# Altium PCB final_PCB.PcbDoc
Units mil, origin at the board's own origin, x right, y up, seen from the top; angles counter-clockwise.
Board outline 5118.11 x 3740.16 mil, 4 copper layers (Top Layer, GND, PWR, Bottom Layer), stack 62.205 mil thick; 45 components, 19 nets, 137 pads, 336 vias.
Unrouted connection lines stored in the file: 5.
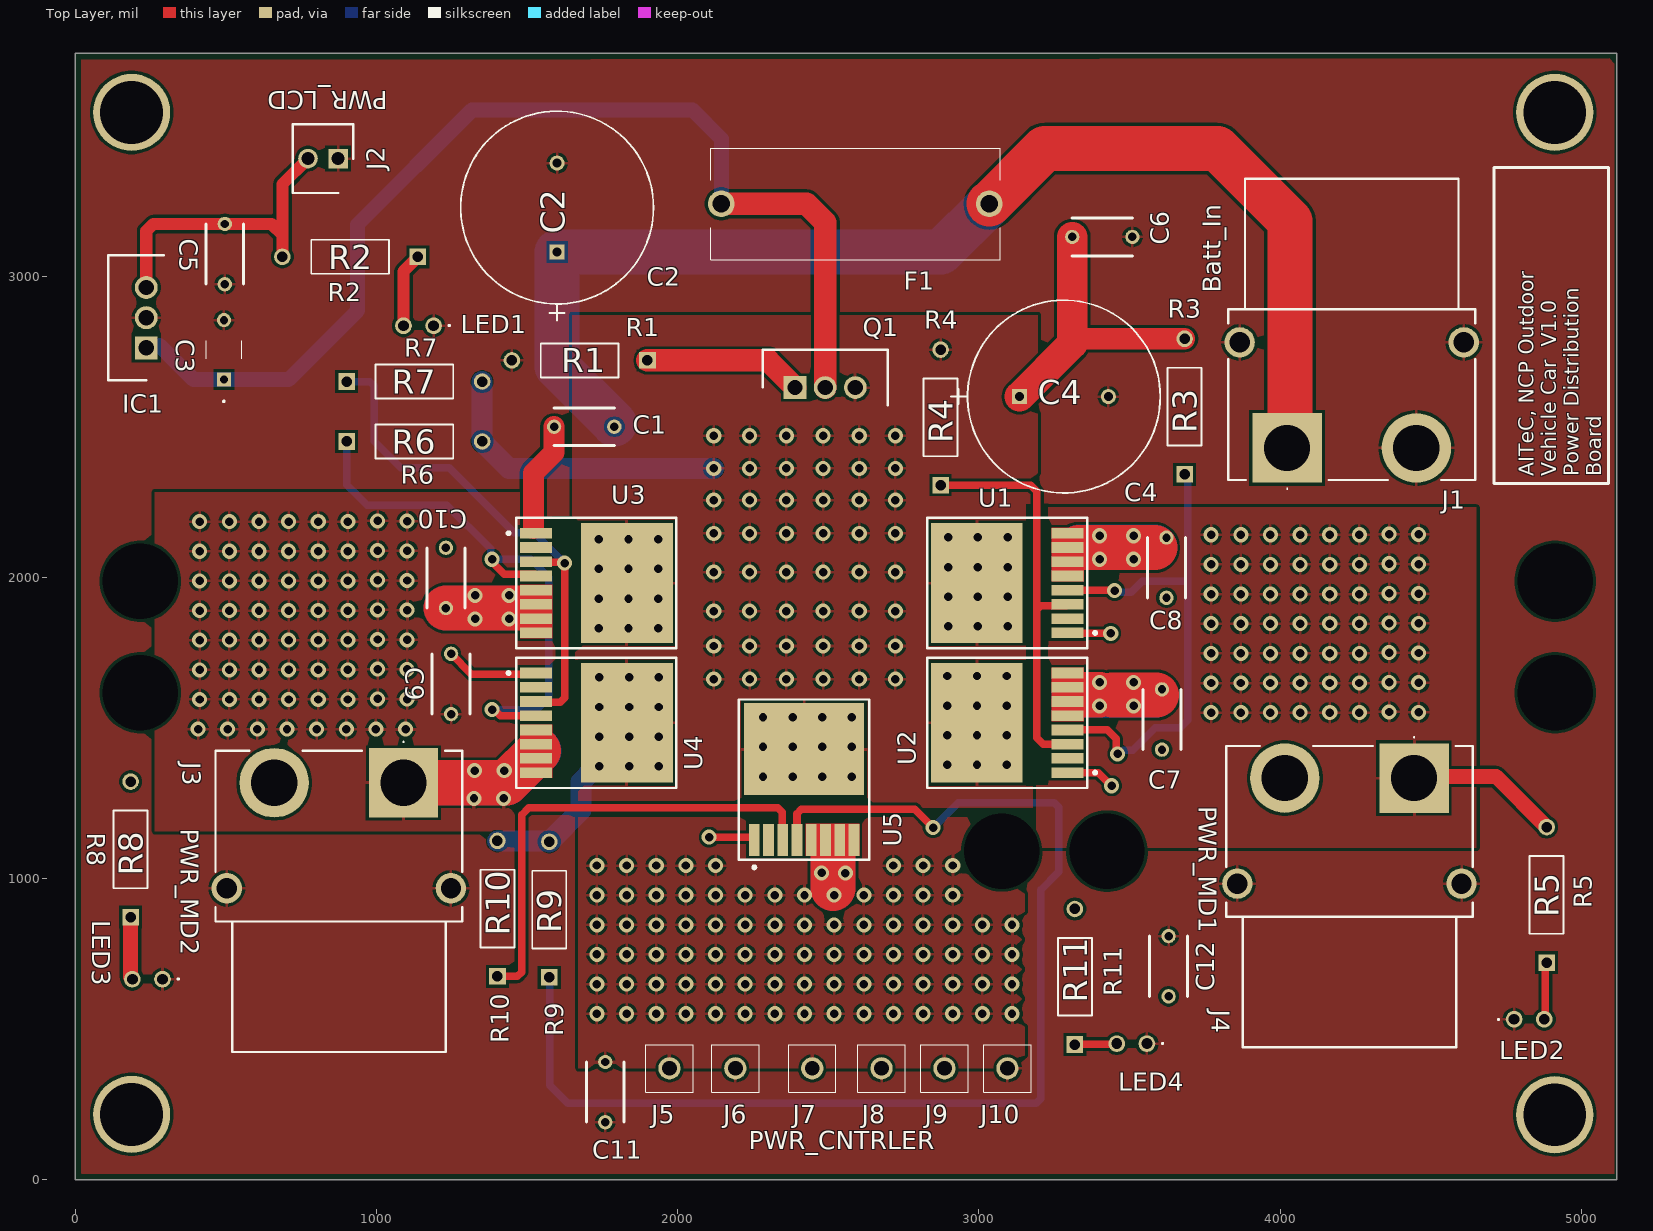
[diagram p0: Top Layer view]
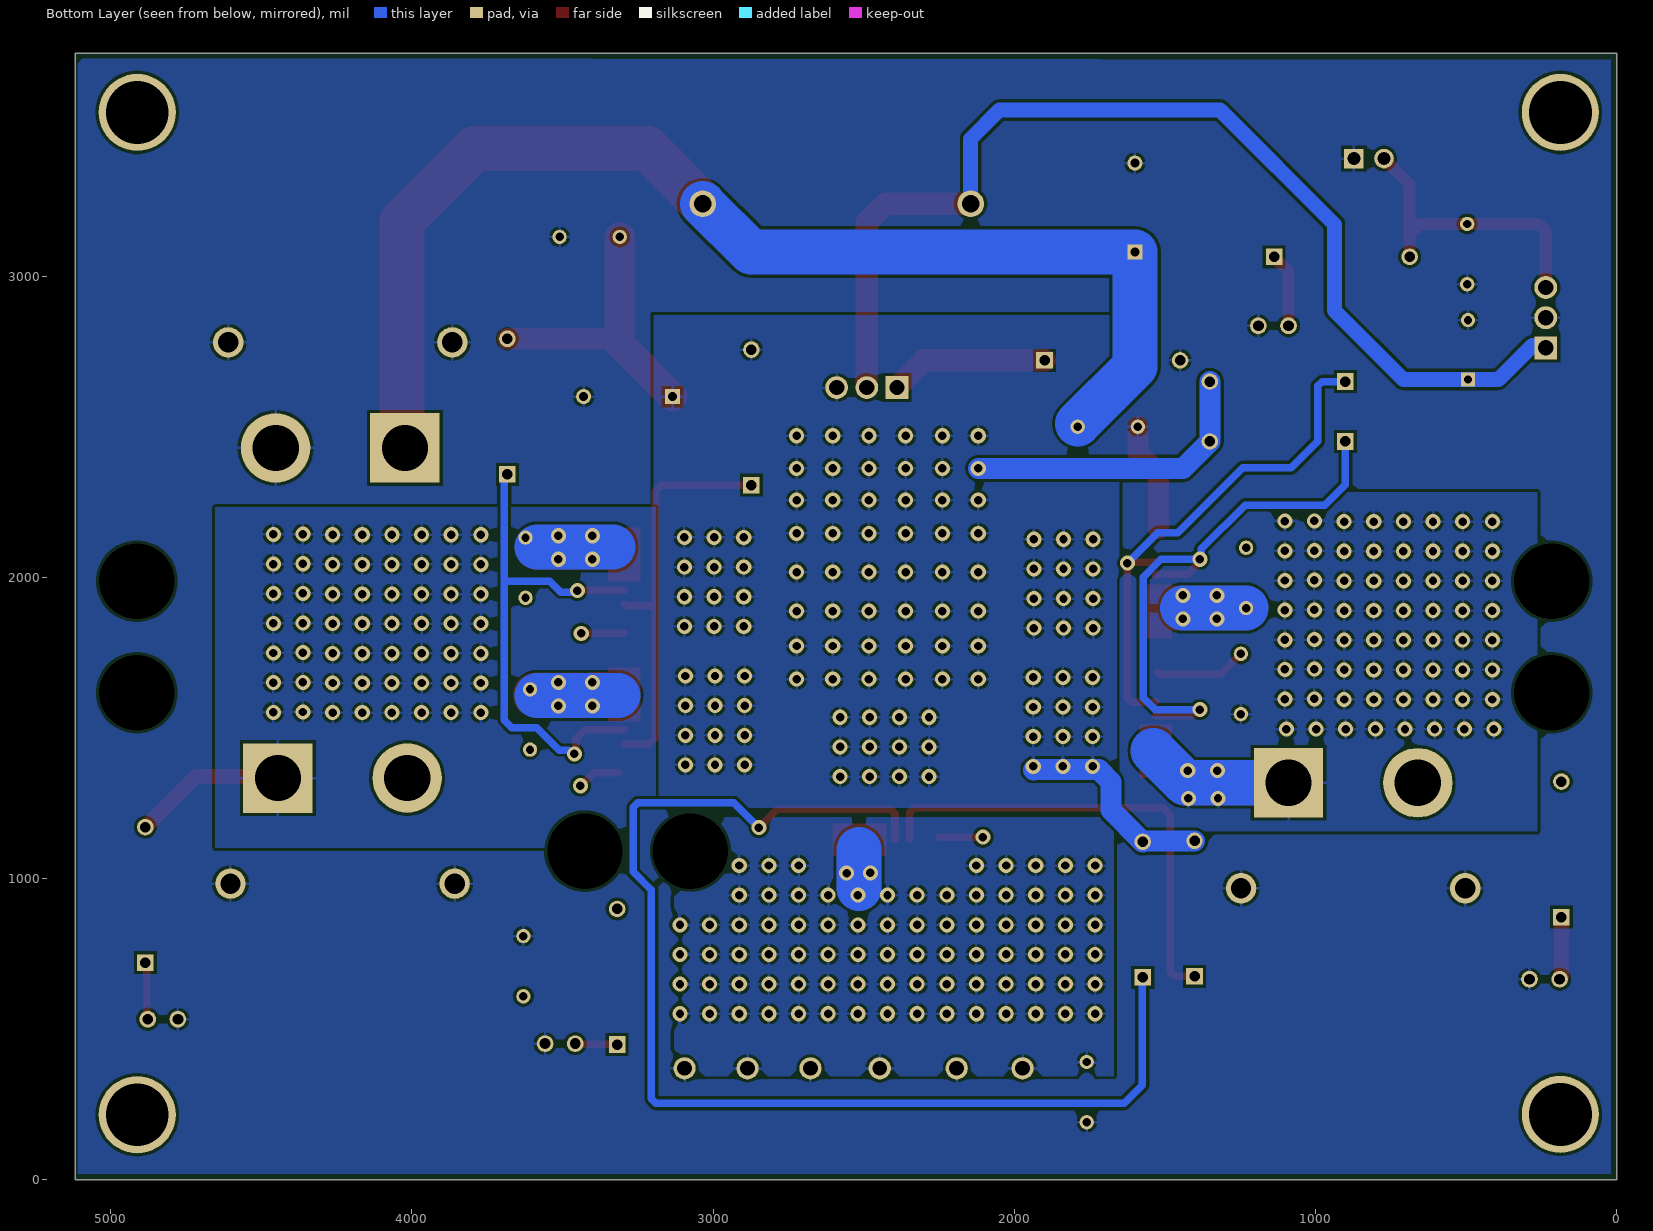
[diagram p1: Bottom Layer view, seen from below]
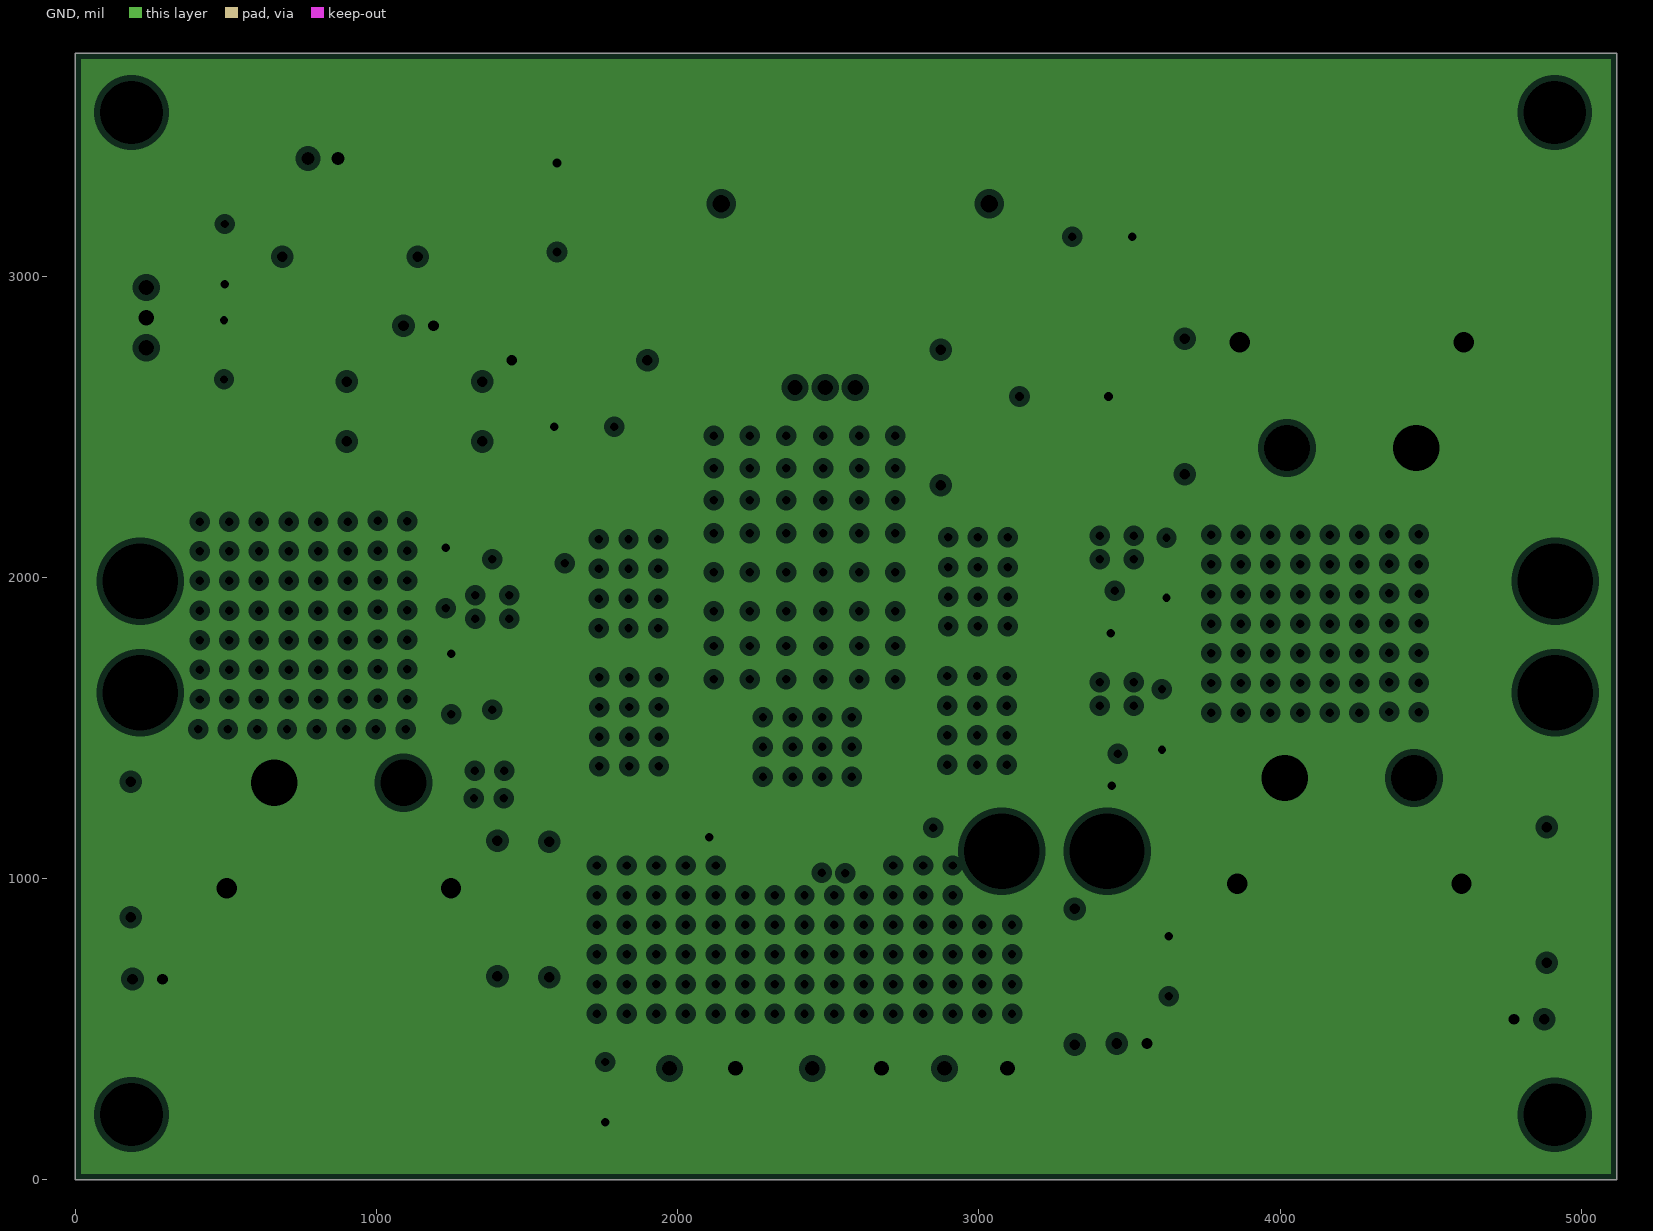
[diagram p2: GND, clearances drawn from the general rule]
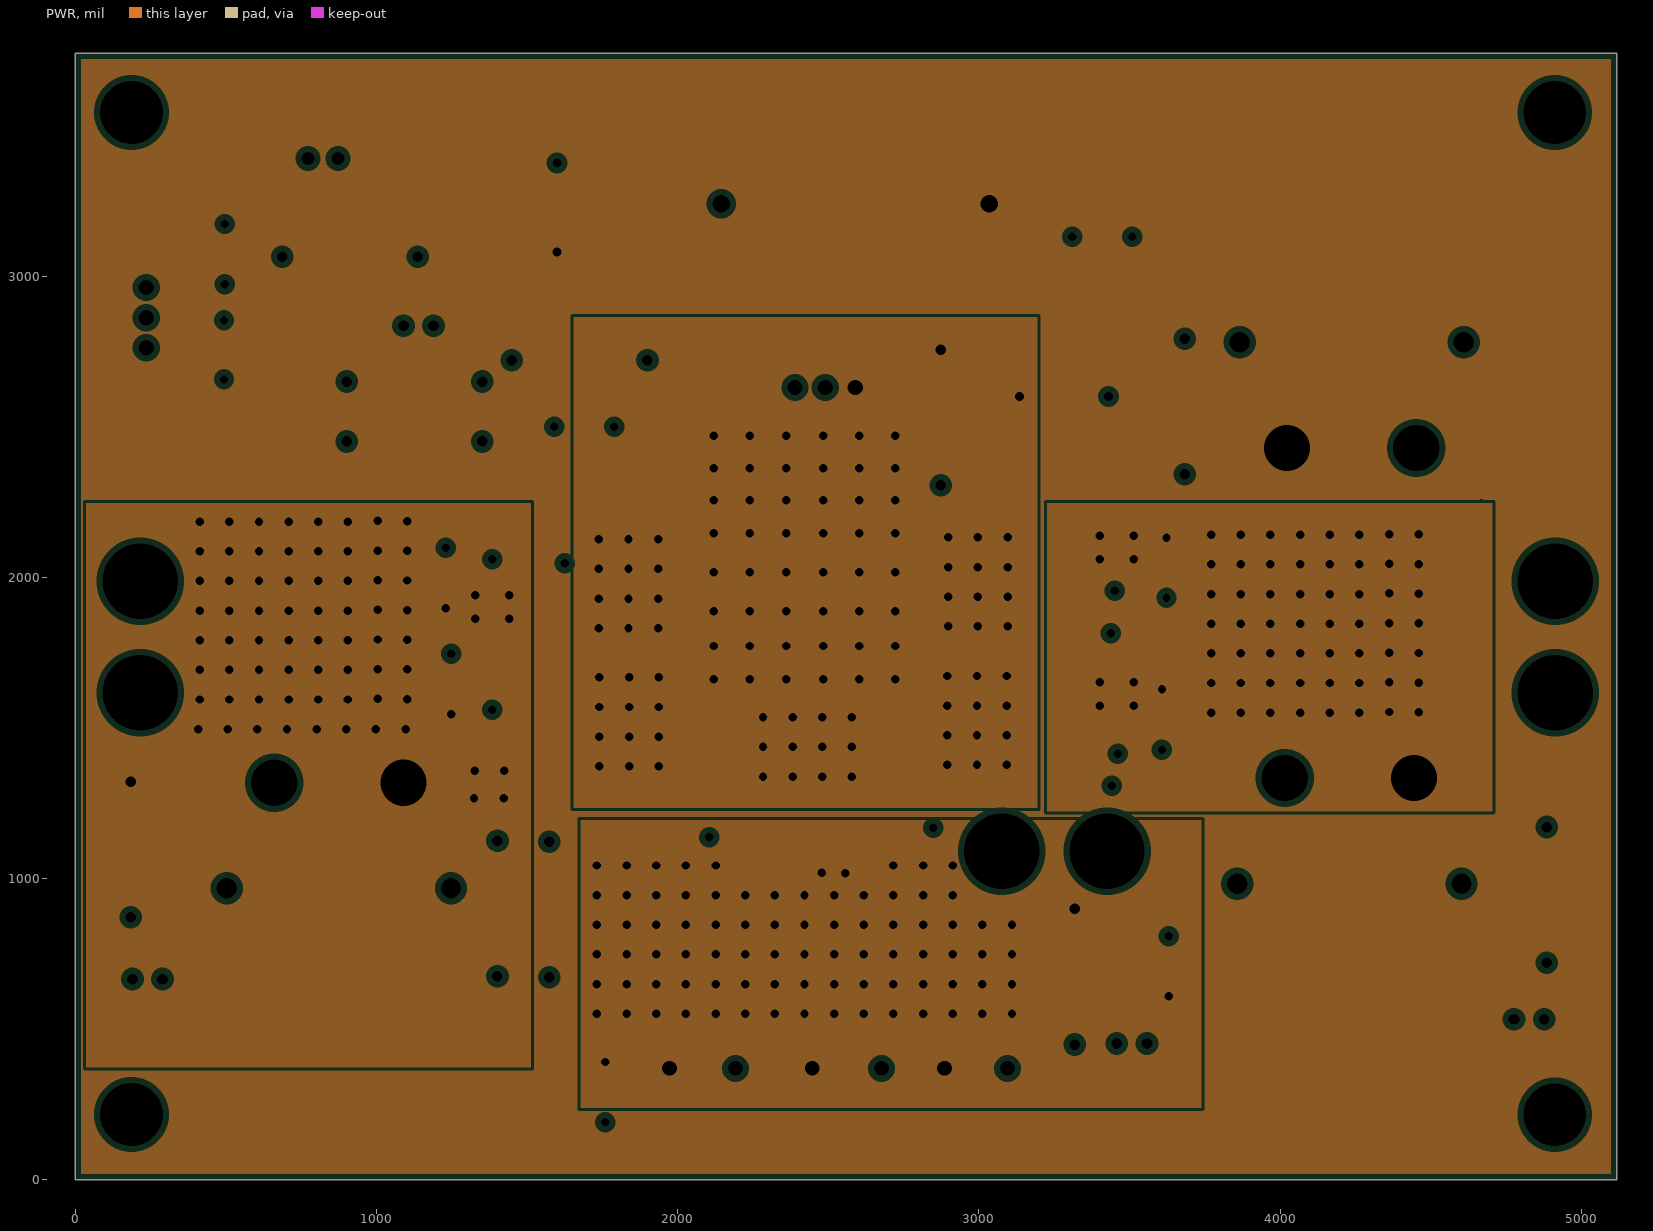
[diagram p3: PWR, clearances drawn from the general rule]
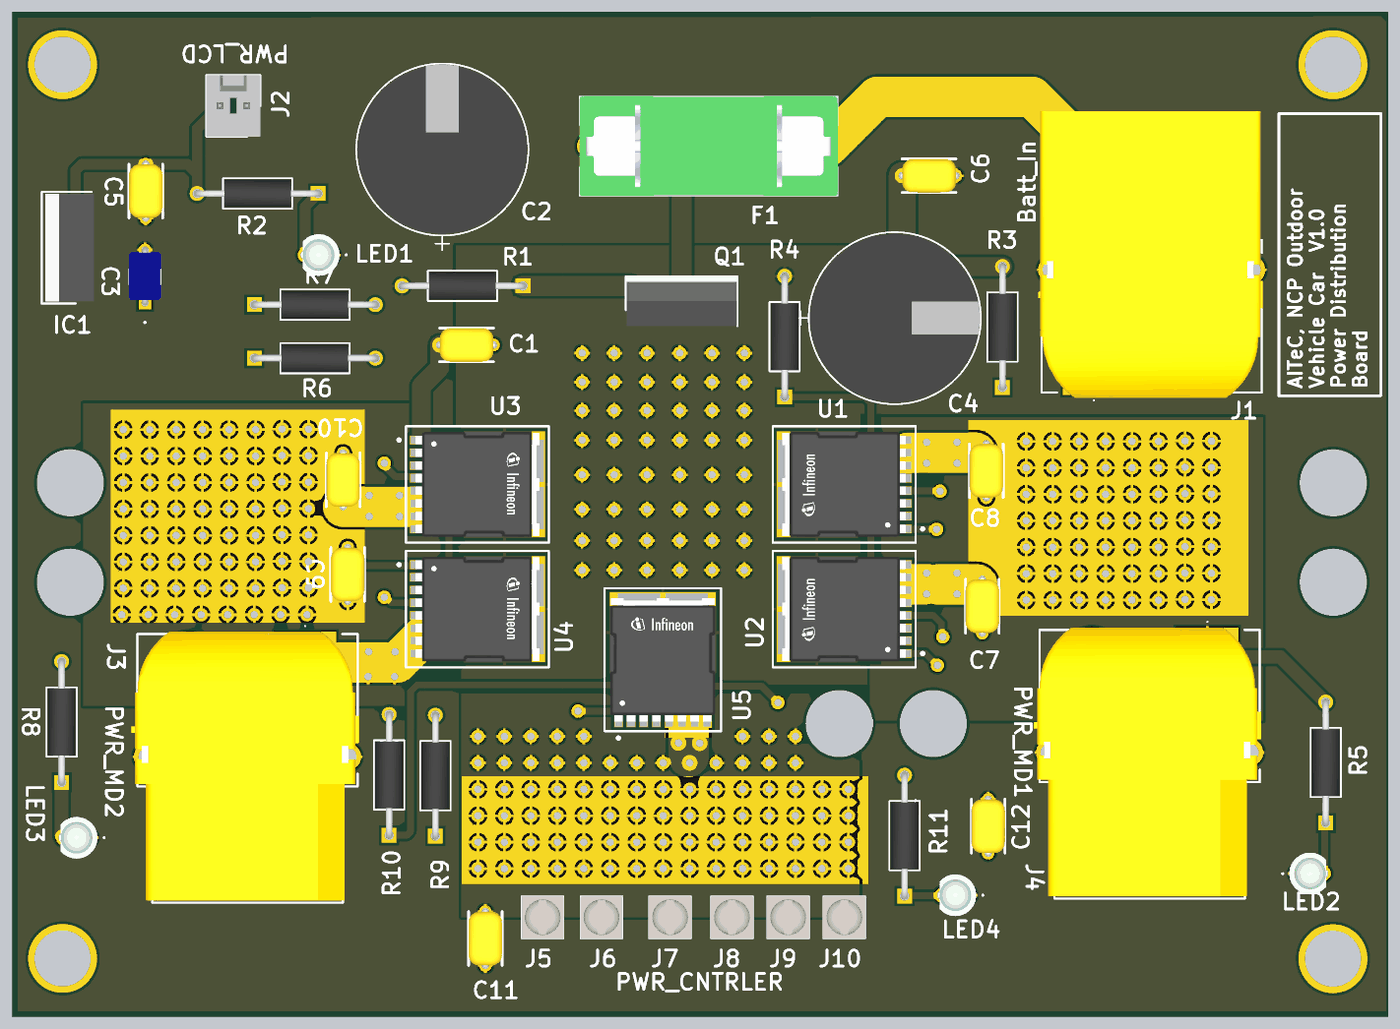
[diagram p4: 3D render of the assembled board from above, using the file's embedded part models]

## Layer stack, top to bottom
Top Solder: solder mask 0.4, Solder Resist, Dk 3.5
Top Layer: signal copper 2.756
Dielectric 2: prepreg 11.811, PP-006, Dk 4.1
GND: plane copper 2.756, net GND
Dielectric 1: dielectric 27.5591, FR-4, Dk 4.8
PWR: plane copper 2.756, net (Multiple Nets)
Dielectric 3: prepreg 11.811, PP-006, Dk 4.1
Bottom Layer: signal copper 2.756
Bottom Solder: solder mask 0.4, Solder Resist, Dk 3.5

## Board outline
0,0 0,3740.16 5118.11,3740.16 5118.11,0

## Design rules (kind name [scope] priority, off if disabled: settings)
Clearance [All] p1: gap=10 ignorepadtopadclearanceinfootprint=TRUE
FabricationTestpoint [All] p1: side=3 testpointundercomponent=TRUE minsize=40 maxsize=100 preferedsize=60 minholesize=0 maxholesize=40 preferedholesize=32 testpointgrid=1 allowsidetop=TRUE allowsidebottom=TRUE usegrid=TRUE gridtolerance=0.01 boardedgeclearance=98.43
HoleSize [All] p1: absolutevalues=TRUE maxlimit=314.96 minlimit=1 maxpercent=80.000 minpercent=20.000
PlaneClearance [All] p1: clearance=20
PlaneConnect [All] p1: planeconnectstyle=Relief reliefexpansion=20 reliefentries=4 reliefconductorwidth=10 reliefairgap=10
PolygonConnect PolygonConnect_1 [HasFootprint('IFX-PG-HSOF-8-5-6-V') vs InNet('Vout_PS1')] p1: connectstyle=Relief reliefconductorwidth=10 reliefentries=4 polygonreliefangle="90 Angle" airgapwidth=10
PolygonConnect [All] p2: connectstyle=Relief reliefconductorwidth=10 reliefentries=4 polygonreliefangle="90 Angle" airgapwidth=10
RoutingVias [All] p1: holewidth=60 width=118 viastyle="Through Hole" minholewidth=28 minwidth=50 maxholewidth=98 maxwidth=195
ShortCircuit ShortCircuit_VOUT3 [OnLayer('Top Layer') vs InNet('Vout_PS3')] p1: allowed=TRUE
ShortCircuit ShortCircuit_VOUT2 [OnLayer('Top Layer') vs InNet('Vout_PS2')] p2: allowed=TRUE
ShortCircuit ShortCircuit_VOUT1 [OnLayer('Top Layer') vs InNet('Vout_PS1')] p3: allowed=TRUE
ShortCircuit [All] p4: allowed=FALSE
SolderMaskExpansion [All] p1: expansion=4 istentingtop=FALSE
SupplyNets "Schematic Supply Nets_5" [InNet('Vout_PS2')] p1: voltage=0.000
SupplyNets "Schematic Supply Nets_4" [InNet('Vout_PS1')] p2: voltage=0.000
SupplyNets "Schematic Supply Nets_3" [InNet('Vin_14V')] p3: voltage=0.000
SupplyNets "Schematic Supply Nets_2" [InNet('Vout_5V')] p4: voltage=0.000
SupplyNets "Schematic Supply Nets_1" [InNet('Vout_PS3')] p5: voltage=0.000
SupplyNets "Schematic Supply Nets" [InNet('GND')] p6: voltage=0.000
Width [All] p1: maxlimit=190 minlimit=25 preferedwidth=150 minimp=50.000000 maximp=50.000000 favimp=50.000000
25 further rules are at their usual default settings.

## Components (designator, comment, footprint, x,y, rotation, side; value= is the part's Value field where it differs from the comment)
C1 "C322C104M5U5TA" C322C104K1R5TA 1690,2500 r180 top
C2 "UHE1H471MHD3" U1-EE_NCH 1600,3080 r90 top
C3 "FA24X7R1H334KNU06" FA24 494,2657 r90 top
C4 "UHE1H471MHD3" U1-EE_NCH 3135,2600 r0 top
C5 "C322C104M5U5TA" C322C104K1R5TA 497,3073 r270 top
C6 "C322C104M5U5TA" C322C104K1R5TA 3410,3130 r0 top
C7 "C322C104M5U5TA" C322C104K1R5TA 3608,1528 r270 top
C8 "C322C104M5U5TA" C322C104K1R5TA 3623,2032 r270 top
C9 "C322C104M5U5TA" C322C104K1R5TA 1248,1646 r90 top
C10 "C322C104M5U5TA" C322C104K1R5TA 1231,1998 r90 top
C11 "C322C104M5U5TA" C322C104K1R5TA 1760,291 r270 top
C12 "C322C104M5U5TA" C322C104K1R5TA 3630,709 r90 top
F1 "0PTF0078P" 0PTF0078P 2590,3240 r180 top
IC1 "LM7805CT_NOPB" TO254P470X1028X1955-3P 236,2762 r90 top
J1 "XT90PW-F" XT90PWM 4023.39,2429.61 r180 top
J2 "0022272021" SHDR2W64P0X254_1X2_508X580X1170P 873,3390 r0 top
J3 "XT90PW-F" XT90PWF 1090,1318 r0 top
J4 "XT90PW-F" XT90PWF 4444.94,1333.58 r0 top
J5 "8730" 8730 1973,370 r0 top
J6 "8730" 8730 2191.76,370 r0 top
J7 "8730" 8730 2447,370 r0 top
J8 "8730" 8730 2677,370 r0 top
J9 "8730" 8730 2886,370 r0 top
J10 "8730" 8730 3095,370 r0 top
LED1 "151031VS06000" "151034GS03000 - duplicate" 1140,2835 r180 top
LED2 "151031VS06000" "151034GS03000 - duplicate" 4827,533 r0 top
LED3 "151031VS06000" "151034GS03000 - duplicate" 240,666 r180 top
LED4 "151031VS06000" "151034GS03000 - duplicate" 3508,452 r180 top
Q1 "IRF4905PBF_1" TO254P469X1042X1967-3P 2390,2630 r0 top
R1 "CF14JT10K0" STA_CF14_STP 1900,2720 r180 top
R2 "CF14JT10K0" STA_CF14_STP 1138,3064 r180 top
R3 "CF14JT1K00" STA_CF14_STP 3683,2342 r90 top
R4 "CF14JT1K00" STA_CF14_STP 2873,2306 r90 top
R5 "CF14JT1K00" STA_CF14_STP 4885,721 r90 top
R6 "CF14JT1K00" STA_CF14_STP 901,2451 r0 top
R7 "CF14JT1K00" STA_CF14_STP 901,2650 r0 top
R8 "CF14JT1K00" STA_CF14_STP 184,872 r90 top
R9 "CF14JT1K00" STA_CF14_STP 1574,672 r90 top
R10 "CF14JT1K00" STA_CF14_STP 1402,675 r90 top
R11 "CF14JT1K00" STA_CF14_STP 3319,449 r90 top
U1 "BTS50005-1LUA" IFX-PG-HSOF-8-5-6-V 3144,1981 r180 top
U2 "BTS50005-1LUA" IFX-PG-HSOF-8-5-6-V 3144,1517 r180 top
U3 "BTS50005-1LUA" IFX-PG-HSOF-8-5-6-V 1681,1981 r0 top
U4 "BTS50005-1LUA" IFX-PG-HSOF-8-5-6-V 1681,1517 r0 top
U5 "BTS50005-1LUA" IFX-PG-HSOF-8-5-6-V 2420,1279.33 r90 top

## Footprints (in the part's own frame and the unit in brackets; to place one, negate y for a bottom-side part, rotate by r counter-clockwise, add the part's x,y. Pads: shape width x height; smd on the part's side, far side on the other; paste and mask are expansions set on the pad)
0PTF0078P [mm]
  round 2.25 hole 1.5: 1(-11.3,0) 2(11.3,0)
  silkscreen extent -12.2,-4.7 12.2,4.7, body extent -12.2,-4.7 12.2,4.7, height 11.45
8730 [mm]
  round 1.875 hole 1.25: 1(0,0)
  silkscreen extent -2,-2 2,2, body extent -2,-2 2,2, height 10.83
"151034GS03000 - duplicate" [mm]
  round 1.41 hole 0.91: 1(-1.27,0) 2(1.27,0)
  silkscreen extent -2.63,-0.05 -2.55,0.02, body extent -1.96,-1.97 1.65,1.98, height 11.02
C322C104K1R5TA [mm]
  round 1.21 hole 0.71: 1(-2.54,0) 2(2.54,0)
  silkscreen extent -2.54,-1.59 2.54,1.59, body extent -2.79,-1.6 2.79,1.59, height 6.64
FA24 [mm]
  rect 1.2x1.2 hole 0.7: 1(0,0)
  round 1.2 hole 0.7: 2(5,0)
  silkscreen extent -1.9,-1.5 3.25,1.5, body extent -0.23,-1.5 5.27,1.5, height 5.96
IFX-PG-HSOF-8-5-6-V [mm] "PG-HSOF-8, SMD, 1.2 mm pitch, 9 pin, 10.375 mm L X 9.90 mm W X 2.30 mm H body"
  rect 2.7x0.9 smd paste-0.45 mask-0.05: 1(-3.827,4.2) 2(-3.827,3) 3(-3.827,1.8) 4(-3.827,0.6)
  rect 2.7x0.9 smd paste-1.3 mask-0.45: 5(-3.827,-0.6) 6(-3.827,-1.8) 7(-3.827,-3) 8(-3.827,-4.2)
  rect 7.743x10.1 smd paste-5.05 mask-5.05: 9(3.827,0)
  Top Layer region: -5.176,-0.15 -2.476,-0.15 -2.476,-4.65 -5.176,-4.65
  silkscreen extent -6.27,-5.5 8,5.5, body extent -4.58,-4.95 7.1,4.95, height 2.3
SHDR2W64P0X254_1X2_508X580X1170P [mm]
  rect 1.65x1.65 hole 1.1: 1(0,0)
  round 1.65 hole 1.1: 2(-2.54,0)
  silkscreen extent -3.81,-2.9 1.27,2.9, body extent -3.82,-2.9 1.26,2.9, height 11.62
STA_CF14_STP [mil]
  rect 55x55 / inner round 60 / far side rect 55x55 hole 35 paste-99999 mask+0: 1(0,0)
  round 55 / inner round 60 / far side round 55 hole 35 paste-99999 mask+0: 2(450,0)
  silkscreen extent 96,-56 354,57, body extent -12,-51 462,51, height 103
TO254P469X1042X1967-3P [mm]
  rect 1.92x1.92 hole 1.28: 1(0,0)
  round 1.92 hole 1.28: 2(2.54,0) 3(5.08,0)
  silkscreen extent -2.73,-1.5 7.81,3.19, body extent -2.67,-1.5 7.75,3.19, height 18.84
TO254P470X1028X1955-3P [mm]
  rect 1.935x1.935 hole 1.29: 1(0,0)
  round 1.935 hole 1.29: 2(2.54,0) 3(5.08,0)
  silkscreen extent -2.73,-1.5 7.81,3.2, body extent -2.53,-1.72 7.63,2.85, height 18.74
U1-EE_NCH [mil]
  rect 50x50 / inner round 60 / far side rect 50x50 hole 30 paste-99999 mask+0: 1(0,0)
  round 50 / inner round 60 / far side round 50 hole 30 paste-99999 mask+0: 2(295,0)
  silkscreen extent -228,-320 467,320, body extent -167,-315 464,315, height 582
XT90PWF [mm]
  rect 5.85x5.85 hole 3.9: 1(0,0)
  round 5.85 hole 3.9: 2(-10.9,0)
  round 2.565 hole 1.71: 3(4,-8.9) 4(-14.9,-8.9)
  silkscreen extent -15.85,-22.7 4.95,3.5, body extent -16.42,-22.48 5.08,2.92, height 10.3
XT90PWM [mm]
  rect 5.85x5.85 hole 3.9: 1(0,0)
  round 5.85 hole 3.9: 2(-10.9,0)
  round 2.565 hole 1.71: 3(4,-8.9) 4(-14.9,-8.9)
  silkscreen extent -15.85,-22.7 4.95,3.5, body extent -15.93,-23.89 5.27,3.21, height 10.3

## Part data
C1 C5 C6 C7 C8 C9 C10 C11 C12: "Capacitor", Manufacturer_Name=KEMET, Mouser Part Number=80-C322C104M5U, Arrow Part Number=C322C104M5U5TA, Arrow Price/Stock=https://www.arrow.com/en/products/c322c104m5u5ta/kemet-corporation?region=nac, Datasheet Link=https://content.kemet.com/datasheets/KEM_C1051_GOLDMAX_Z5U.pdf, Height=6.6mm, Manufacturer_Part_Number=C322C104M5U5TA, Mouser Price/Stock=https://www.mouser.co.uk/ProductDetail/KEMET/C322C104M5U5TA?qs=CDCeLP2tGBsLrnt3J6Fqow%3D%3D
C2 C4: "No Description Available", Manufacturer_Name=Nichicon, Copyright="Copyright (C) 2025 Ultra Librarian. All rights reserved.", Manufacturer_Part_Number=UHE1H471MHD3
C3: "Capacitor", Manufacturer_Name=TDK, Mouser Part Number=810-FA24X7R1H334KNU6, Datasheet Link=https://product.tdk.com/system/files/dam/doc/product/capacitor/ceramic/lead-mlcc/catalog/leadmlcc_halogenfree_fa_en.pdf, Height=7mm, Manufacturer_Part_Number=FA24X7R1H334KNU06, Mouser Price/Stock=https://www.mouser.co.uk/ProductDetail/TDK/FA24X7R1H334KNU06?qs=UrFqKgNWc7RVEnsmQuzgwg%3D%3D
F1: "Undefined or Miscellaneous", Manufacturer_Name=LITTELFUSE, Mouser Part Number=576-0PTF0078P, Arrow Part Number=0PTF0078P, Arrow Price/Stock=https://www.arrow.com/en/products/0ptf0078p/littelfuse?utm_currency=USD&region=nac, Datasheet Link=https://media.digikey.com/pdf/Data%20Sheets/Littelfuse%20PDFs/PTF075_77_78.pdf, Height=11.5mm, Manufacturer_Part_Number=0PTF0078P, Mouser Price/Stock=https://www.mouser.co.uk/ProductDetail/Littelfuse/0PTF0078P?qs=Co4VkB5J4%2Fsczy6gG8s%2FsA%3D%3D
IC1: "Integrated Circuit", Arrow Part Number=LM7805CT/NOPB, Manufacturer_Name="Texas Instruments", Mouser Part Number=926-LM7805CT/NOPB, Arrow Price/Stock=https://www.arrow.com/en/products/lm7805ctnopb/texas-instruments?utm_currency=USD&region=nac, Datasheet Link=http://www.ti.com/lit/gpn/lm7800, Height=4.7mm, Manufacturer_Part_Number=LM7805CT/NOPB, Mouser Price/Stock=https://www.mouser.co.uk/ProductDetail/Texas-Instruments/LM7805CT-NOPB?qs=OYMYEaN9QmBS2GvaX6GSkQ%3D%3D
J1 J3 J4: "Connector: DC supply; socket; female; XT90; 40A; 500V; PIN: 2; THT", Manufacturer_Name=Amass, Datasheet Link=https://www.tme.eu/Document/7357a049cc8e5ea73e34d2124a313a81/XT90PW.pdf, Geometry.Height=10.3mm, Manufacturer_Part_Number=XT90PW-F
J2: "Connector", Manufacturer_Name=Molex, Mouser Part Number=N/A, Arrow Part Number=0022272021, Arrow Price/Stock=https://www.arrow.com/en/products/0022272021/molex?utm_currency=USD&region=nac, Datasheet Link=https://www.molex.com/webdocs/datasheets/pdf/en-us/0022272021_PCB_HEADERS.pdf, Height=11.7mm, Manufacturer_Part_Number=0022272021, Mouser Price/Stock=https://www.mouser.co.uk/ProductDetail/Molex/0022272021?qs=PBcRNPEHKsoTuJ7eDXMaUA%3D%3D
J5 J6 J7 J8 J9 J10: "Connector", Manufacturer_Name="Keystone Electronics", Mouser Part Number=534-8730, Datasheet Link=https://www.digikey.ph/en/products/detail/keystone-electronics/8730/2170366, Height=4.88mm, Manufacturer_Part_Number=8730, Mouser Price/Stock=https://www.mouser.co.uk/ProductDetail/Keystone-Electronics/8730?qs=%252B%252BPv0l39JAEHqkiHVP218w%3D%3D
LED1 LED2 LED3 LED4: "LED", Manufacturer_Name="Wurth Elektronik", Mouser Part Number=710-151031VS06000, Datasheet Link=https://katalog.we-online.de/led/datasheet/151031VS06000.pdf, Manufacturer_Part_Number=151031VS06000, Mouser Price/Stock=https://www.mouser.co.uk/ProductDetail/Wurth-Elektronik/151031VS06000?qs=LlUlMxKIyB01ggED1iKswA%3D%3D
Q1: "MOSFET (P-Channel)", Arrow Part Number=IRF4905PBF, Manufacturer_Name=Infineon, Mouser Part Number=942-IRF4905PBF, Arrow Price/Stock=https://www.arrow.com/en/products/irf4905pbf/infineon-technologies-ag?utm_currency=USD&region=europe, Datasheet Link=https://datasheet.datasheetarchive.com/originals/distributors/Datasheets_SAMA/e52aa5f51fe2980ce3912b85b4d53dd4.pdf, Height=4.69mm, Manufacturer_Part_Number=IRF4905PBF, Mouser Price/Stock=https://www.mouser.co.uk/ProductDetail/Infineon-Technologies/IRF4905PBF?qs=9%252BKlkBgLFf39l0HsWdxvdw%3D%3D
R1 R2 R3 R4 R5 R6 R7 R8 R9 R10 R11: "No Description Available", Mfr_Name="Stackpole International"
U1 U2 U3 U4 U5: "Smart High-Side Power Switch", Manufacturer="Infineon Technologies", Manufacturer Order Number=BTS50005-1LUA, PackageReference=PG-HSOF-8-5-6

## Free pads (board coordinates)
  round 255.91 hole 208.66 paste-99999 mask+0: 5(187.64,217) 5(187.64,3543.31) 5(4912.06,215.85) 5(4912.06,3543.31)
  round 230.31 hole 250 unplated: 5(216.54,1617) 5(216.54,1987) 5(3075.8,1091) 5(3425.8,1091) 5(4913.39,1617) 5(4913.39,1987)

## Via types
v1: diameter 50, hole 28, Top Layer to Bottom Layer, 336 vias

## Nets (pads, with @x,y where several pads share a name; then routed paths per layer and width w, separated by ;. In a path a pad name is that pad's centre, name@x,y a point inside that pad or via, vN(x,y) a via of type N, cw(c..) or ccw(c..) an arc to the next point about the centre after c; other vN are vias at no path point)
DEN1: R9.1 U5.4 | length 4039.4
  Top Layer w25: U5.4 2396.38,1215.36 2411.02,1230 2787,1230 v1(2848,1169)
  Bottom Layer w25: R9.1 1576,670 1576,314 1636,254 3190.36,254 3205,268.64 3205,962 3265,1022 3265,1237.36 3250.36,1252 2931,1252 v1(2848,1169)
DEN2: R3.1 U1.4 U2.4 | length 1745.3
  Top Layer w25: U2.4 3426.86,1493.38 3456.22,1464.02 3456.22,1418.78 v1(3461,1414) ; U1.4 3295.36,1956.69 3450.31,1956.69 v1(3451,1956)
  Bottom Layer w25: v1(3451,1956) 3455.78,1951.22 3506.22,1951.22 3542,1987 3687,1987 3694,1994 ; v1(3461,1414) 3467.76,1414 3480.26,1426.5 3511.5,1426.5 3586,1501 3669,1501 3694,1526 3694,1994 ; R3.1 3694,2331 3694,1994
DEN3: R6.1 U3.4 U4.4 | length 1891.6
  Top Layer w25: v1@1379.5,2055.5 1425.16,2009.84 1525.11,2009.84 U3.4 ; v1(1384,1561) 1390.76,1561 1411.14,1540.62 U4.4
  Bottom Layer w25: R6.1 901,2308 969,2240 1234,2240 1379.81,2094.19 1379.81,2064.19 v1(1384,2060) 1513.36,2060 1573,2000.36 1573,1601 1533,1561 v1(1384,1561)
GND: C1.2 C2.2 C3.2 C4.2 C5.2 C6.2 C7.2 C8.2 C9.2 C10.2 C11.2 C12.2 IC1.2 J1.2 J1.3 J1.4 J2.1 J3.2 J3.3 J3.4 J4.2 J4.3 J4.4 J6.1 J8.1 J10.1 LED1.1 LED2.1 LED3.1 LED4.1 R1.2 U1.1 U2.1 U3.1 U4.1 U5.1 | length 1107.8
  Top Layer w25: C9.2 1315.61,1678.39 1517.6,1678.39 U4.1@1524.21,1685 ; v1(2104.43,1137.4) U5.1@2249.43,1137.4 ; U1.1 3295.49,1814.82 3437.18,1814.82 v1(3438,1814) ; U2.1@3313.67,1351.65 3396.26,1351.65 3439.9,1308 v1(3441,1308)
  Top Layer w70: U3.1@1521.33,2162 1521.33,2346.33 1590,2415 C1.2
IN1: R10.1 U5.3 | length 1578
  Top Layer w25: R10.1 1467.36,675 1482,689.64 1482,1211 1506,1235 2332.36,1235 2347,1220.36 U5.3@2347,1130.8
IN2: R4.1 U1.3 U2.3 | length 1365.4
  Top Layer w25: R4.1 3172,2306 3193,2285 3193,1893 ; U2.3 3214.51,1446.13 3193,1467.64 3193,1893 ; U1.3 3289.45,1904.92 3204.92,1904.92 3193,1893
IN3: R7.1 U3.3 U4.3 | length 1725.7
  Top Layer w25: U4.3 1532.2,1586 1610.36,1586 1625,1600.64 v1(1625,2047) 1622.57,2049.43 1532.76,2049.43 U3.3
  Bottom Layer w25: R7.1 978.36,2650 993,2635.36 993,2452 1081,2364 1242,2364 1458,2148 1524,2148 v1(1625,2047)
NetLED1_2: LED1.2 R2.1 | length 248.9
  Top Layer w40: LED1.2 1090,3016 R2.1
NetLED2_2: LED2.2 R5.1 | length 191.3
  Top Layer w25: LED2.2 4881,537 4881,717 R5.1
NetLED3_2: LED3.2 R8.1 | length 198.5
  Top Layer w50: LED3.2@184,673.49 R8.1
NetLED4_2: LED4.2 R11.1 | length 141.7
  Top Layer w25: R11.1 3320.5,450.5 3456.5,450.5 LED4.2
  Top Layer w50: LED4.2@3456.51,452 LED4.2
NetQ1_1: Q1.1 R1.1 | length 527.3
  Top Layer w75: R1.1 2300,2720 Q1.1
Vin: C1.1 C2.1 F1.1 J1.1 | length 4067.8
  Top Layer w150: F1.1 3218.88,3424 3792,3424 4033,3183 J1.1@4033,2439.22
  Bottom Layer w150: C1.1@1790,2510 1600,2700 C2.1 2874.88,3080 F1.1
Vin_14V: C3.1 F1.2 IC1.1 Q1.2 | length 3623.6
  Top Layer w75: F1.2 2428.07,3240 2490,3178.07 Q1.2
  Bottom Layer w50: 280,2770 393,2657 C3.1 709,2657 938,2886 938,3172 1317,3551 2050,3551 2145.12,3455.88 F1.2
Vout_5V: C5.1 IC1.3 J2.2 R2.2 | length 1025.4
  Top Layer w40: IC1.3 236,3149.57 259.43,3173 C5.1 652,3173 688,3137 ; R2.2 688,3137 ; J2.2 688,3305 688,3137
Vout_14V: C4.1 C6.1 Q1.3 R3.2 R4.2 R6.2 R7.2 R9.2 R10.2 U1.9 U2.9 U3.9 U4.9 U5.9 | length 2676.9
  Top Layer w70: 3310,2775 3327,2792 R3.2
  Top Layer w100: C4.1 3310,2775 C6.1
  Bottom Layer w70: R7.2 R6.2 1441,2361 v1@2118.99,2361 ; R10.2 1571,1125 R9.2 1679,1227 1679,1320.99 1720.01,1362 1935,1362 v1@1936,1361
  other v1: 2283.46,1338.58 2381.89,1338.58 2480.32,1338.58 2578.74,1338.58 1740.57,1372.57 1839,1372.57 1937.43,1372.57 2895.57,1377.15 2994,1377.15 3092.43,1377.15 2283.46,1437.01 2381.89,1437.01 2480.32,1437.01 2578.74,1437.01 1740.57,1471 1839,1471 1937.43,1471 2895.57,1475.57 2994,1475.57 3092.43,1475.57 2283.46,1535.43 2381.89,1535.43 2480.32,1535.43 2578.74,1535.43 1740.57,1569.43 1839,1569.43 1937.43,1569.43 2895.57,1574 2994,1574 3092.43,1574 2120,1662.01 2239.02,1662.01 2360.98,1662.01 2482.99,1662.01 2602.99,1662.01 2722.99,1662.01 1740.57,1667.85 1839,1667.85 1937.43,1667.85 2895.57,1672.43 2994,1672.43 3092.43,1672.43 2120,1772.01 2239.02,1772.01 2360.98,1772.01 2482.99,1772.01 2602.99,1772.01 2722.99,1772.01 1738.57,1831.15 1837,1831.15 1935.43,1831.15 2898.57,1837.15 2997,1837.15 3095.43,1837.15 2120,1887.99 2239.02,1887.99 2360.98,1887.99 2482.99,1887.99 2602.99,1887.99 2722.99,1887.99 1738.57,1929.57 1837,1929.57 1935.43,1929.57 2898.57,1935.57 2997,1935.57 3095.43,1935.57 2120,2017.01 2239.02,2017.01 2360.98,2017.01 2482.99,2017.01 2602.99,2017.01 2722.99,2017.01 1738.57,2028 1837,2028 1935.43,2028 2898.57,2034 2997,2034 3095.43,2034 1738.57,2126.43 1837,2126.43 1935.43,2126.43 2898.57,2132.43 2997,2132.43 3095.43,2132.43 2120,2145.98 2239.02,2145.98 2360.98,2145.98 2482.99,2145.98 2602.99,2145.98 2722.99,2145.98 2120,2256.02 2239.02,2256.02 2360.98,2256.02 2482.99,2256.02 2602.99,2256.02 2722.99,2256.02 2120,2362.01 2239.02,2362.01 2360.98,2362.01 2482.99,2362.01 2602.99,2362.01 2722.99,2362.01 2120,2470 2239.02,2470 2360.98,2470 2482.99,2470 2602.99,2470 2722.99,2470
Vout_PS1: C11.1 C12.1 J5.1 J7.1 J9.1 R11.2 U5.5 U5.6 U5.7 U5.8 | length 258
  Top Layer w150: v1@2516,967 2516,1096
  Bottom Layer w150: v1@2516,967 2516,1096
  other v1: 1732.28,551.18 1830.71,551.18 1929.13,551.18 2027.56,551.18 2125.98,551.18 2224.41,551.18 2322.83,551.18 2421.26,551.18 2519.68,551.18 2618.11,551.18 2716.54,551.18 2814.96,551.18 2913.39,551.18 3011.81,551.18 3110.24,551.18 1732.28,649.61 1830.71,649.61 1929.13,649.61 2027.56,649.61 2125.98,649.61 2224.41,649.61 2322.83,649.61 2421.26,649.61 2519.68,649.61 2618.11,649.61 2716.54,649.61 2814.96,649.61 2913.39,649.61 3011.81,649.61 3110.24,649.61 1732.28,748.03 1830.71,748.03 1929.13,748.03 2027.56,748.03 2125.98,748.03 2224.41,748.03 2322.83,748.03 2421.26,748.03 2519.68,748.03 2618.11,748.03 2716.54,748.03 2814.96,748.03 2913.39,748.03 3011.81,748.03 3110.24,748.03 1732.28,846.46 1830.71,846.46 1929.13,846.46 2027.56,846.46 2125.98,846.46 2224.41,846.46 2322.83,846.46 2421.26,846.46 2519.68,846.46 2618.11,846.46 2716.54,846.46 2814.96,846.46 2913.39,846.46 3011.81,846.46 3110.24,846.46 1732.28,944.88 1830.71,944.88 1929.13,944.88 2027.56,944.88 2125.98,944.88 2224.41,944.88 2322.83,944.88 2421.26,944.88 2519.68,944.88 2618.11,944.88 2716.54,944.88 2814.96,944.88 2913.39,944.88 2557,1018 2478,1019 1732.28,1043.31 1830.71,1043.31 1929.13,1043.31 2027.56,1043.31 2125.98,1043.31 2716.54,1043.31 2814.96,1043.31 2913.39,1043.31
Vout_PS2: C7.1 C8.1 J4.1 R5.2 U1.5 U1.6 U1.7 U1.8 U2.5 U2.6 U2.7 U2.8 | length 1507.4
  Top Layer w50: J4.1@4449.94,1338.58 4717.42,1338.58 R5.2
  Top Layer w150: 3317,1610 3401,1610 ; U1.7@3332,2099.11 3583.89,2099.11 3584,2099 ; 3443,1609 3589,1609
  Bottom Layer w150: 3316.38,1607.97 3585.38,1607.97 ; 3332.15,2100.18 3584.04,2100.18
  other v1: 3771.3,1550.72 3869.72,1550.72 3968.15,1550.72 4066.57,1550.72 4165,1550.72 4263.43,1550.72 4460.28,1551.96 4361.85,1552.96 3401,1573 3514,1573 3771.3,1649.15 3869.72,1649.15 3968.15,1649.15 4066.57,1649.15 4165,1649.15 4263.43,1649.15 4460.28,1650.39 3401,1651 3514,1651 4361.85,1651.39 3771.3,1747.57 3869.72,1747.57 3968.15,1747.57 4066.57,1747.57 4165,1747.57 4263.43,1747.57 4460.28,1748.81 4361.85,1749.81 3771.3,1846 3869.72,1846 3968.15,1846 4066.57,1846 4165,1846 4263.43,1846 4460.28,1847.24 4361.85,1848.24 3771.3,1944.43 3869.72,1944.43 3968.15,1944.43 4066.57,1944.43 4165,1944.43 4263.43,1944.43 4460.28,1945.66 4361.85,1946.66 3771.3,2042.85 3869.72,2042.85 3968.15,2042.85 4066.57,2042.85 4165,2042.85 4263.43,2042.85 4460.28,2044.09 4361.85,2045.09 3401,2060 3514,2060 3401,2138 3514,2138 3771.3,2141.28 3869.72,2141.28 3968.15,2141.28 4066.57,2141.28 4165,2141.28 4263.43,2141.28 4460.28,2142.51 4361.85,2143.51
Vout_PS3: C9.1 C10.1 J3.1 R8.2 U3.5 U3.6 U3.7 U3.8 U4.5 U4.6 U4.7 U4.8 | length 1464.8
  Top Layer w150: J3.1 1326,1318 1432,1318 1538,1424 ; C10.1 1441,1898 U3.6@1502,1898
  Bottom Layer w150: J3.1@1091,1318 1324,1318 1433,1318 1539,1424 ; C10.1 1441,1898
  other v1: 1324,1266 1422.43,1266 1326,1358 1424.43,1358 408,1496.06 506.43,1496.06 604.85,1496.06 703.28,1496.06 801.7,1496.06 900.13,1496.06 998.55,1496.06 1096.98,1496.06 413.39,1594.49 511.81,1594.49 610.24,1594.49 708.66,1594.49 807.09,1594.49 905.51,1594.49 1102.36,1595.72 1003.94,1596.72 413.39,1692.91 511.81,1692.91 610.24,1692.91 708.66,1692.91 807.09,1692.91 905.51,1692.91 1102.36,1694.15 1003.94,1695.15 413.39,1791.34 511.81,1791.34 610.24,1791.34 708.66,1791.34 807.09,1791.34 905.51,1791.34 1102.36,1792.57 1003.94,1793.57 1328,1862 1441,1862 413.39,1889.76 511.81,1889.76 610.24,1889.76 708.66,1889.76 807.09,1889.76 905.51,1889.76 1102.36,1891 1003.94,1892 1328,1940 1441,1940 413.39,1988.19 511.81,1988.19 610.24,1988.19 708.66,1988.19 807.09,1988.19 905.51,1988.19 1102.36,1989.43 1003.94,1990.43 413.39,2086.61 511.81,2086.61 610.24,2086.61 708.66,2086.61 807.09,2086.61 905.51,2086.61 1102.36,2087.85 1003.94,2088.85 413.39,2185.04 511.81,2185.04 610.24,2185.04 708.66,2185.04 807.09,2185.04 905.51,2185.04 1102.36,2186.28 1003.94,2187.28
pads on no net: U1.2 U2.2 U3.2 U4.2 U5.2

## Polygon pours and split planes (outlines as drawn)
Vout_PS2 on Top Layer "VOUT_PS2_L01_P003" (solid, remove dead copper, pour order 3): 3190,2232 4652,2232 4652,1102 3190,1102
GND on Top Layer "GND_L01_P015" (solid, pour order 15): 5110,3723 5110,20 22,20 20,22 20,3718
Vout_PS1 on Top Layer "VOUT_PS1_L01_P001" (solid, remove dead copper, pour order 1): 1671,1203 3152,1203 3152,370.1 1671,370.1
Vout_14V on Top Layer "VOUT_14V_L01_P004" (solid, remove dead copper, pour order 4): 1650,2444 1650,2334 1650,1235 3196,1235 3196,2870 1650,2870
Vout_PS3 on Top Layer "VOUT_PS3_L01_P002" (solid, remove dead copper, pour order 2): 265,2283 1669.25,2283 1669.25,1157 265,1157
GND on Bottom Layer "GND_L04_P016" (solid, pour order 16): 5110,3723 5110,20 22,20 20,22 20,3718
Vout_PS1 on Bottom Layer "VOUT_PS1_L04_P011" (solid, remove dead copper, pour order 11): 1671,1203 3130,1203 3130,343.49 1671,343.49
Vout_14V on Bottom Layer "VOUT_14V_L04_P014" (solid, remove dead copper, pour order 14): 1651.62,2444.38 1651.62,2334.38 1651.62,1235.38 3197.62,1235.38 3197.62,2870.38 1651.62,2870.38
Vout_PS2 on Bottom Layer "VOUT_PS2_L04_P012" (solid, remove dead copper, pour order 12): 3190.27,2232.18 4652.27,2232.18 4652.27,1102.18 3190.27,1102.18
Vout_PS3 on Bottom Layer "VOUT_PS3_L04_P008" (solid, remove dead copper, pour order 8): 264.84,2282.65 1649.84,2282.65 1649.84,1156.65 264.84,1156.65
Vin on PWR (split plane): 5098.01,20.1 20.1,20.1 20.1,3720.06 5098.01,3720.06
Vout_PS3 on PWR (split plane): 1512.9,2245.9 1512.9,372.1 36.1,372.1 36.1,2245.9
Vout_PS1 on PWR (split plane): 3739.9,238.1 1677.1,238.1 1677.1,281.75 1677.1,1193.9 3739.9,1193.9
Vout_14V on PWR (split plane): 3193.9,2861 3193.9,1235.1 1655.1,1235.1 1655.1,2864.9 3193.9,2864.9
Vout_PS2 on PWR (split plane): 4704.9,1223.1 3227.1,1223.1 3227.1,2245.9 4704.9,2245.9
GND on GND (split plane): 5098.01,20.1 20.1,20.1 20.1,3720.06 5098.01,3720.06

## Other copper
Top Layer:
  pour cut-out: 1593.48,1563.06 1528.09,1257.94 1593,1259 1594.06,1257.94 1671,1257.94 1650,2203.71 1593,2203.71
  pour cut-out: 2436.21,1192.04 2436.21,1229.79 2436,1230 2425.93,1230 2423,1223 2420.32,1214.74
  pour cut-out: 2452,1267 2444.36,1274.64 2435.34,1265.63 2435.34,1253.43 2448.58,1240.2 2449.63,1240.2
  pour cut-out: 3178.9,2244.1 3231.29,2244.1 3231.29,1310 3155.75,1310 3155.75,2179.62 3155.75,2244.1
PWR (plane layer: these items are gaps in the copper):
  lines w10: 31,367 31,2251 ; 32,367 1518,367 1518,2251 32,2251 ; 3745,233 1737,233 1672,233 1672,281.75 1672,1199 3745,1199 ; 3745,237 3745,1196 ; 4668,2255 4669,2256 ; 4709,2251 3222,2251 3222,1218 4656,1218 4710,1218 4710,2252 ; 1650,1230 3177,1230 3199,1230 3199,2861 3199,2870 2314,2870 1709,2870 1650,2870 1650,1230

## Silkscreen, mask and mechanical layers (free items; w line width, h text height)
Top Overlay:
  lines w10: 4710.8,2311 5090.8,2311 5090.8,3361 4710.8,3361 4710.8,2311
  text "PWR_LCD" at 1037,3614 h60 r180
  text "Batt_In" at 3803,2944 h60 r90
  text "AITeC, NCP Outdoor  / Vehicle Car  V1.0 / Power Distribution / Board" at 5066.95,2335 h50 r90
  text "PWR_MD1" at 3730,1240 h60 r270
  text "PWR_MD2" at 350,1165.98 h60 r270
  text "PWR_CNTRLER" at 2237,101 h60
Top Solder:
  rectangle: 3556,1492 4598,2221
  rectangle: 2427.87,1038 2602.98,1175.84
  region: 3184,494 3184,896 1672,896 1672,494
  rectangle: 2427.87,1038 2428,1179.84
  rectangle: 367,1466 1311,2260
  lines w150: 1090,1318 1426,1318 ; 1231.24,1897.51 1499.24,1897.51 ; 1432,1318 1538,1424 ; 3034.88,3240 3218.88,3424 3792,3424 4033,3183 4033,2439.22 ; 3294.27,2098.64 3583.49,2098.64 ; 3315,1609 3584,1609
Mechanical 13:
  lines w25: 0,0 0,3740.16 5118.11,3740.16 5118.11,0 0,0 ; -0.01,3737.51 0,3737.5

## Dimensions
187.64,3543.31 to 187.64,217 on Mechanical 13
5118.11,0 to 0,0 on Mechanical 13
5118.11,3740.16 to 5118.11,0 on Mechanical 13
4912.06,3543.31 to 187.64,3543.31 on Mechanical 13

## Text inside footprints (layer, text, board x,y; h text height)
C2: Mechanical 13 "RefDes2" at 1625,3140 h50 r90
C4: Mechanical 13 "RefDes2" at 3195,2575 h50
R1: Mechanical 13 "RefDes2" at 1762.5,2745 h50 r180
R2: Mechanical 13 "RefDes2" at 1000.5,3089 h50 r180
R3: Mechanical 13 "RefDes2" at 3708,2479.5 h50 r90
R4: Mechanical 13 "RefDes2" at 2898,2443.5 h50 r90
R5: Mechanical 13 "RefDes2" at 4910,858.5 h50 r90
R6: Mechanical 13 "RefDes2" at 1038.5,2426 h50
R7: Mechanical 13 "RefDes2" at 1038.5,2625 h50
R8: Mechanical 13 "RefDes2" at 209,1009.5 h50 r90
R9: Mechanical 13 "RefDes2" at 1599,809.5 h50 r90
R10: Mechanical 13 "RefDes2" at 1427,812.5 h50 r90
R11: Mechanical 13 "RefDes2" at 3344,586.5 h50 r90